# Altium PCB adau1979-fpga.PcbDoc (part 3 of 10)
Units mil, origin at the board's own origin, x right, y up, seen from the top; angles counter-clockwise.
Board outline 7874.02 x 9055.12 mil, 4 copper layers (Top Layer, GND, POWER, Bottom Layer), stack 23.756 mil thick; 636 components, 457 nets, 2015 pads, 4184 vias.
Unrouted connection lines stored in the file: 10.
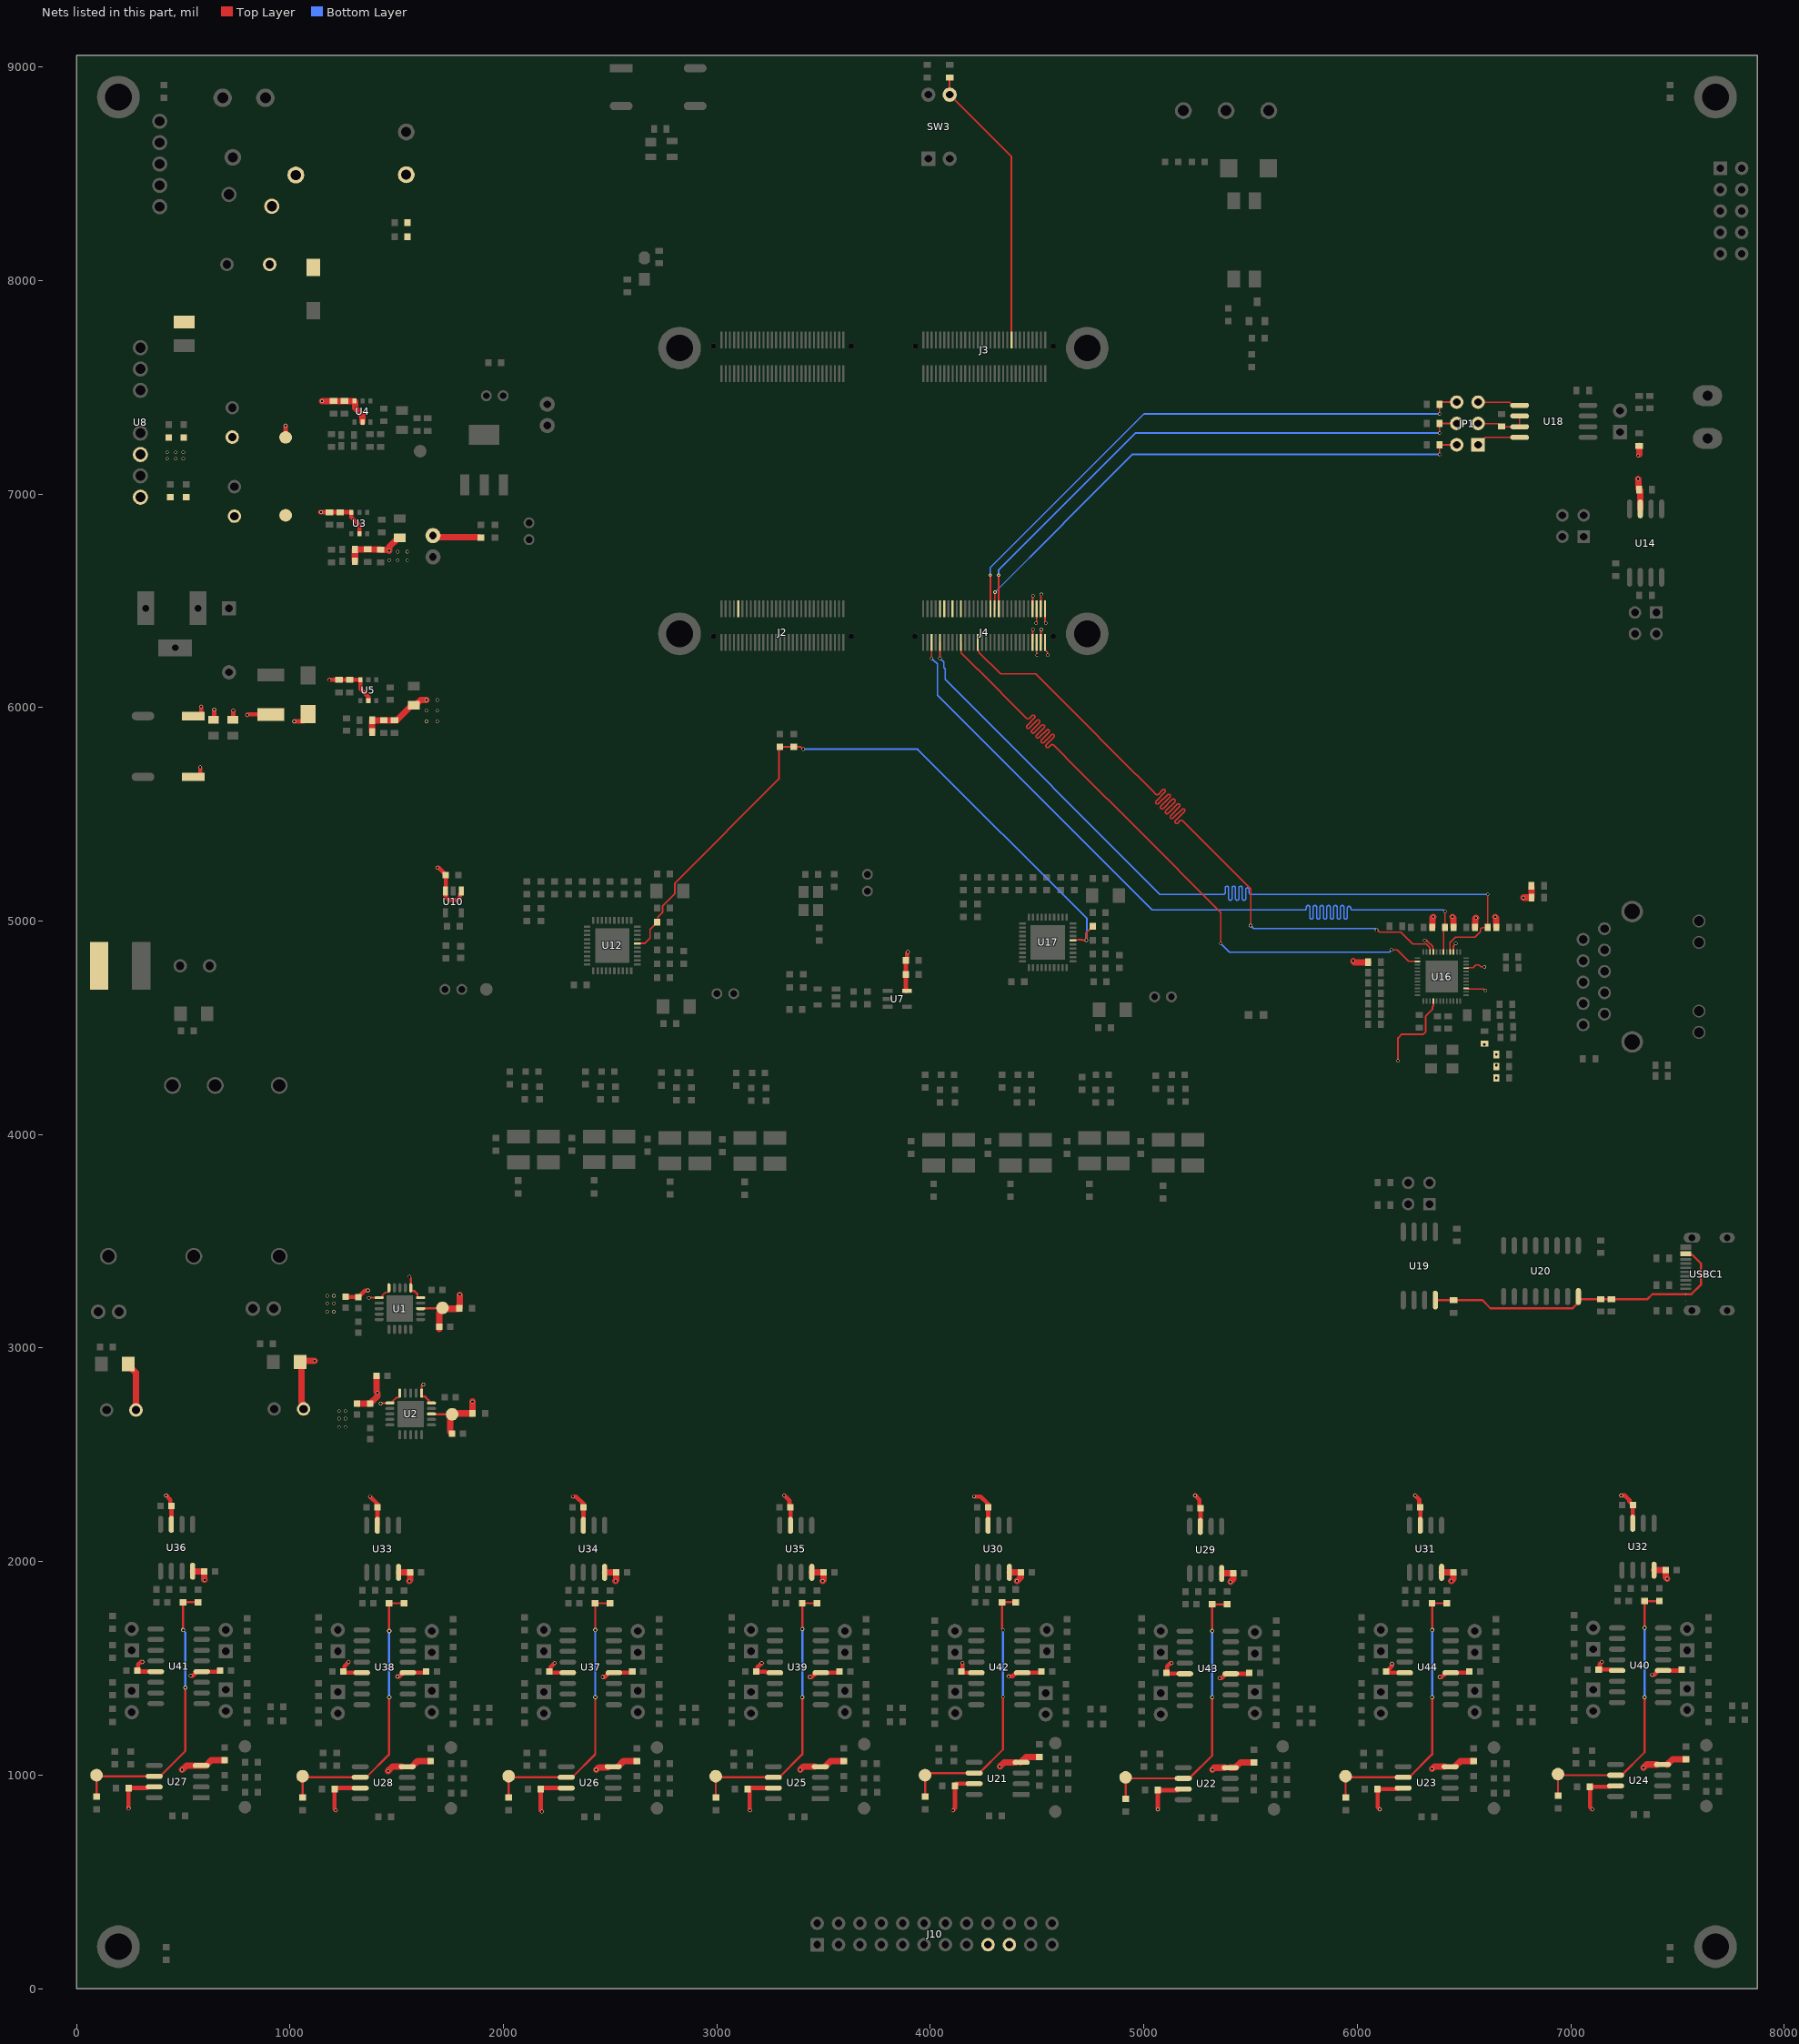
[diagram p4: the nets of this part, all layers, seen from the top]

## Part data (continued)
CON1 J6 J7 JP2 JP3 JP4 JP5 JP6 JP7 JP8 JP9 JP10 JP11 JP12 JP13 JP14 JP15 JP16 JP17 JP18 JP19 JP20 JP21 JP22 JP23 JP24 JP (continued)
  JP16: AddInBom=yes, DesignItemID="Header 2", Device="Header 2", FootprintName=HDR2.54-LI-2P, LibraryName="5.4 - 接插件-脚距2.54 (100mil)", Origin Footprint=XH2.54-WI-2P, OriginFootprint 2=XH2.54-LI-2P, OriginFootprint 3=HDR2.54-M-LI-2P, OriginFootprint 4=HDR2.54-WI-2P, OriginFootprint 5=HDR2.54-WS-2P, OriginFootprint 6=HDR2.54-Y-LI-2P, OriginFootprint 7=HDR2.54-M-WS-2P, OriginFootprint 8=KF2510-LI-2P, OriginFootprint 9=XH2.54-WS-2P, OriginFootprint 10=XH2.54-LS-2P, OriginFootprint 11=KF2EDGK-2.54-LI-2P, OriginFootprint 12=KF2EDGK-2.54-WI-2P, OriginModelName=HDR2.54-1P, SymbolName="Header 2", UniqueId=57b57ccbe062354d, 版权归属="封装库来自淘宝 ID：黄晶宝石", 联系售后=https://shop463601444.taobao.com
  JP17: AddInBom=yes, DesignItemID="Header 2", Device="Header 2", FootprintName=HDR2.54-LI-2P, LibraryName="5.4 - 接插件-脚距2.54 (100mil)", Origin Footprint=XH2.54-WI-2P, OriginFootprint 2=XH2.54-LI-2P, OriginFootprint 3=HDR2.54-M-LI-2P, OriginFootprint 4=HDR2.54-WI-2P, OriginFootprint 5=HDR2.54-WS-2P, OriginFootprint 6=HDR2.54-Y-LI-2P, OriginFootprint 7=HDR2.54-M-WS-2P, OriginFootprint 8=KF2510-LI-2P, OriginFootprint 9=XH2.54-WS-2P, OriginFootprint 10=XH2.54-LS-2P, OriginFootprint 11=KF2EDGK-2.54-LI-2P, OriginFootprint 12=KF2EDGK-2.54-WI-2P, OriginModelName=HDR2.54-1P, SymbolName="Header 2", UniqueId=c40e93d5b111b9de, 版权归属="封装库来自淘宝 ID：黄晶宝石", 联系售后=https://shop463601444.taobao.com
  JP18: AddInBom=yes, DesignItemID="Header 2", Device="Header 2", FootprintName=HDR2.54-LI-2P, LibraryName="5.4 - 接插件-脚距2.54 (100mil)", Origin Footprint=XH2.54-WI-2P, OriginFootprint 2=XH2.54-LI-2P, OriginFootprint 3=HDR2.54-M-LI-2P, OriginFootprint 4=HDR2.54-WI-2P, OriginFootprint 5=HDR2.54-WS-2P, OriginFootprint 6=HDR2.54-Y-LI-2P, OriginFootprint 7=HDR2.54-M-WS-2P, OriginFootprint 8=KF2510-LI-2P, OriginFootprint 9=XH2.54-WS-2P, OriginFootprint 10=XH2.54-LS-2P, OriginFootprint 11=KF2EDGK-2.54-LI-2P, OriginFootprint 12=KF2EDGK-2.54-WI-2P, OriginModelName=HDR2.54-1P, SymbolName="Header 2", UniqueId=d84cd54a2cd93ea0, 版权归属="封装库来自淘宝 ID：黄晶宝石", 联系售后=https://shop463601444.taobao.com
  JP19: AddInBom=yes, DesignItemID="Header 2", Device="Header 2", FootprintName=HDR2.54-LI-2P, LibraryName="5.4 - 接插件-脚距2.54 (100mil)", Origin Footprint=XH2.54-WI-2P, OriginFootprint 2=XH2.54-LI-2P, OriginFootprint 3=HDR2.54-M-LI-2P, OriginFootprint 4=HDR2.54-WI-2P, OriginFootprint 5=HDR2.54-WS-2P, OriginFootprint 6=HDR2.54-Y-LI-2P, OriginFootprint 7=HDR2.54-M-WS-2P, OriginFootprint 8=KF2510-LI-2P, OriginFootprint 9=XH2.54-WS-2P, OriginFootprint 10=XH2.54-LS-2P, OriginFootprint 11=KF2EDGK-2.54-LI-2P, OriginFootprint 12=KF2EDGK-2.54-WI-2P, OriginModelName=HDR2.54-1P, SymbolName="Header 2", UniqueId=dacbd2010d520776, 版权归属="封装库来自淘宝 ID：黄晶宝石", 联系售后=https://shop463601444.taobao.com
  JP20: AddInBom=yes, DesignItemID="Header 2", Device="Header 2", FootprintName=HDR2.54-LI-2P, LibraryName="5.4 - 接插件-脚距2.54 (100mil)", Origin Footprint=XH2.54-WI-2P, OriginFootprint 2=XH2.54-LI-2P, OriginFootprint 3=HDR2.54-M-LI-2P, OriginFootprint 4=HDR2.54-WI-2P, OriginFootprint 5=HDR2.54-WS-2P, OriginFootprint 6=HDR2.54-Y-LI-2P, OriginFootprint 7=HDR2.54-M-WS-2P, OriginFootprint 8=KF2510-LI-2P, OriginFootprint 9=XH2.54-WS-2P, OriginFootprint 10=XH2.54-LS-2P, OriginFootprint 11=KF2EDGK-2.54-LI-2P, OriginFootprint 12=KF2EDGK-2.54-WI-2P, OriginModelName=HDR2.54-1P, SymbolName="Header 2", UniqueId=61cd62acef56a4b1, 版权归属="封装库来自淘宝 ID：黄晶宝石", 联系售后=https://shop463601444.taobao.com
  JP21: AddInBom=yes, DesignItemID="Header 2", Device="Header 2", FootprintName=HDR2.54-LI-2P, LibraryName="5.4 - 接插件-脚距2.54 (100mil)", Origin Footprint=XH2.54-WI-2P, OriginFootprint 2=XH2.54-LI-2P, OriginFootprint 3=HDR2.54-M-LI-2P, OriginFootprint 4=HDR2.54-WI-2P, OriginFootprint 5=HDR2.54-WS-2P, OriginFootprint 6=HDR2.54-Y-LI-2P, OriginFootprint 7=HDR2.54-M-WS-2P, OriginFootprint 8=KF2510-LI-2P, OriginFootprint 9=XH2.54-WS-2P, OriginFootprint 10=XH2.54-LS-2P, OriginFootprint 11=KF2EDGK-2.54-LI-2P, OriginFootprint 12=KF2EDGK-2.54-WI-2P, OriginModelName=HDR2.54-1P, SymbolName="Header 2", UniqueId=228f0eb2e9fc8410, 版权归属="封装库来自淘宝 ID：黄晶宝石", 联系售后=https://shop463601444.taobao.com
  JP22: AddInBom=yes, DesignItemID="Header 2", Device="Header 2", FootprintName=HDR2.54-LI-2P, LibraryName="5.4 - 接插件-脚距2.54 (100mil)", Origin Footprint=XH2.54-WI-2P, OriginFootprint 2=XH2.54-LI-2P, OriginFootprint 3=HDR2.54-M-LI-2P, OriginFootprint 4=HDR2.54-WI-2P, OriginFootprint 5=HDR2.54-WS-2P, OriginFootprint 6=HDR2.54-Y-LI-2P, OriginFootprint 7=HDR2.54-M-WS-2P, OriginFootprint 8=KF2510-LI-2P, OriginFootprint 9=XH2.54-WS-2P, OriginFootprint 10=XH2.54-LS-2P, OriginFootprint 11=KF2EDGK-2.54-LI-2P, OriginFootprint 12=KF2EDGK-2.54-WI-2P, OriginModelName=HDR2.54-1P, SymbolName="Header 2", UniqueId=8401f236ce86758e, 版权归属="封装库来自淘宝 ID：黄晶宝石", 联系售后=https://shop463601444.taobao.com
  JP23: AddInBom=yes, DesignItemID="Header 2", Device="Header 2", FootprintName=HDR2.54-LI-2P, LibraryName="5.4 - 接插件-脚距2.54 (100mil)", Origin Footprint=XH2.54-WI-2P, OriginFootprint 2=XH2.54-LI-2P, OriginFootprint 3=HDR2.54-M-LI-2P, OriginFootprint 4=HDR2.54-WI-2P, OriginFootprint 5=HDR2.54-WS-2P, OriginFootprint 6=HDR2.54-Y-LI-2P, OriginFootprint 7=HDR2.54-M-WS-2P, OriginFootprint 8=KF2510-LI-2P, OriginFootprint 9=XH2.54-WS-2P, OriginFootprint 10=XH2.54-LS-2P, OriginFootprint 11=KF2EDGK-2.54-LI-2P, OriginFootprint 12=KF2EDGK-2.54-WI-2P, OriginModelName=HDR2.54-1P, SymbolName="Header 2", UniqueId=81515d3ba89c45d7, 版权归属="封装库来自淘宝 ID：黄晶宝石", 联系售后=https://shop463601444.taobao.com
  JP24: AddInBom=yes, DesignItemID="Header 2", Device="Header 2", FootprintName=HDR2.54-LI-2P, LibraryName="5.4 - 接插件-脚距2.54 (100mil)", Origin Footprint=XH2.54-WI-2P, OriginFootprint 2=XH2.54-LI-2P, OriginFootprint 3=HDR2.54-M-LI-2P, OriginFootprint 4=HDR2.54-WI-2P, OriginFootprint 5=HDR2.54-WS-2P, OriginFootprint 6=HDR2.54-Y-LI-2P, OriginFootprint 7=HDR2.54-M-WS-2P, OriginFootprint 8=KF2510-LI-2P, OriginFootprint 9=XH2.54-WS-2P, OriginFootprint 10=XH2.54-LS-2P, OriginFootprint 11=KF2EDGK-2.54-LI-2P, OriginFootprint 12=KF2EDGK-2.54-WI-2P, OriginModelName=HDR2.54-1P, SymbolName="Header 2", UniqueId=0a06460673946c5c, 版权归属="封装库来自淘宝 ID：黄晶宝石", 联系售后=https://shop463601444.taobao.com
  JP25: AddInBom=yes, DesignItemID="Header 2", Device="Header 2", FootprintName=HDR2.54-LI-2P, LibraryName="5.4 - 接插件-脚距2.54 (100mil)", Origin Footprint=XH2.54-WI-2P, OriginFootprint 2=XH2.54-LI-2P, OriginFootprint 3=HDR2.54-M-LI-2P, OriginFootprint 4=HDR2.54-WI-2P, OriginFootprint 5=HDR2.54-WS-2P, OriginFootprint 6=HDR2.54-Y-LI-2P, OriginFootprint 7=HDR2.54-M-WS-2P, OriginFootprint 8=KF2510-LI-2P, OriginFootprint 9=XH2.54-WS-2P, OriginFootprint 10=XH2.54-LS-2P, OriginFootprint 11=KF2EDGK-2.54-LI-2P, OriginFootprint 12=KF2EDGK-2.54-WI-2P, OriginModelName=HDR2.54-1P, SymbolName="Header 2", UniqueId=ac1a4a7fdd8dee85, 版权归属="封装库来自淘宝 ID：黄晶宝石", 联系售后=https://shop463601444.taobao.com
  JP26: AddInBom=yes, DesignItemID="Header 2", Device="Header 2", FootprintName=HDR2.54-LI-2P, LibraryName="5.4 - 接插件-脚距2.54 (100mil)", Origin Footprint=XH2.54-WI-2P, OriginFootprint 2=XH2.54-LI-2P, OriginFootprint 3=HDR2.54-M-LI-2P, OriginFootprint 4=HDR2.54-WI-2P, OriginFootprint 5=HDR2.54-WS-2P, OriginFootprint 6=HDR2.54-Y-LI-2P, OriginFootprint 7=HDR2.54-M-WS-2P, OriginFootprint 8=KF2510-LI-2P, OriginFootprint 9=XH2.54-WS-2P, OriginFootprint 10=XH2.54-LS-2P, OriginFootprint 11=KF2EDGK-2.54-LI-2P, OriginFootprint 12=KF2EDGK-2.54-WI-2P, OriginModelName=HDR2.54-1P, SymbolName="Header 2", UniqueId=7ff5f6d6ea161ff3, 版权归属="封装库来自淘宝 ID：黄晶宝石", 联系售后=https://shop463601444.taobao.com
  JP27: AddInBom=yes, DesignItemID="Header 2", Device="Header 2", FootprintName=HDR2.54-LI-2P, LibraryName="5.4 - 接插件-脚距2.54 (100mil)", Origin Footprint=XH2.54-WI-2P, OriginFootprint 2=XH2.54-LI-2P, OriginFootprint 3=HDR2.54-M-LI-2P, OriginFootprint 4=HDR2.54-WI-2P, OriginFootprint 5=HDR2.54-WS-2P, OriginFootprint 6=HDR2.54-Y-LI-2P, OriginFootprint 7=HDR2.54-M-WS-2P, OriginFootprint 8=KF2510-LI-2P, OriginFootprint 9=XH2.54-WS-2P, OriginFootprint 10=XH2.54-LS-2P, OriginFootprint 11=KF2EDGK-2.54-LI-2P, OriginFootprint 12=KF2EDGK-2.54-WI-2P, OriginModelName=HDR2.54-1P, SymbolName="Header 2", UniqueId=02277a1cd8d596a2, 版权归属="封装库来自淘宝 ID：黄晶宝石", 联系售后=https://shop463601444.taobao.com
  JP28: AddInBom=yes, DesignItemID="Header 2", Device="Header 2", FootprintName=HDR2.54-LI-2P, LibraryName="5.4 - 接插件-脚距2.54 (100mil)", Origin Footprint=XH2.54-WI-2P, OriginFootprint 2=XH2.54-LI-2P, OriginFootprint 3=HDR2.54-M-LI-2P, OriginFootprint 4=HDR2.54-WI-2P, OriginFootprint 5=HDR2.54-WS-2P, OriginFootprint 6=HDR2.54-Y-LI-2P, OriginFootprint 7=HDR2.54-M-WS-2P, OriginFootprint 8=KF2510-LI-2P, OriginFootprint 9=XH2.54-WS-2P, OriginFootprint 10=XH2.54-LS-2P, OriginFootprint 11=KF2EDGK-2.54-LI-2P, OriginFootprint 12=KF2EDGK-2.54-WI-2P, OriginModelName=HDR2.54-1P, SymbolName="Header 2", UniqueId=0f3af21d7fc89682, 版权归属="封装库来自淘宝 ID：黄晶宝石", 联系售后=https://shop463601444.taobao.com
  JP29: AddInBom=yes, DesignItemID="Header 2", Device="Header 2", FootprintName=HDR2.54-LI-2P, LibraryName="5.4 - 接插件-脚距2.54 (100mil)", Origin Footprint=XH2.54-WI-2P, OriginFootprint 2=XH2.54-LI-2P, OriginFootprint 3=HDR2.54-M-LI-2P, OriginFootprint 4=HDR2.54-WI-2P, OriginFootprint 5=HDR2.54-WS-2P, OriginFootprint 6=HDR2.54-Y-LI-2P, OriginFootprint 7=HDR2.54-M-WS-2P, OriginFootprint 8=KF2510-LI-2P, OriginFootprint 9=XH2.54-WS-2P, OriginFootprint 10=XH2.54-LS-2P, OriginFootprint 11=KF2EDGK-2.54-LI-2P, OriginFootprint 12=KF2EDGK-2.54-WI-2P, OriginModelName=HDR2.54-1P, SymbolName="Header 2", UniqueId=935b54861c2e40de, 版权归属="封装库来自淘宝 ID：黄晶宝石", 联系售后=https://shop463601444.taobao.com
  JP30: AddInBom=yes, DesignItemID="Header 2", Device="Header 2", FootprintName=HDR2.54-LI-2P, LibraryName="5.4 - 接插件-脚距2.54 (100mil)", Origin Footprint=XH2.54-WI-2P, OriginFootprint 2=XH2.54-LI-2P, OriginFootprint 3=HDR2.54-M-LI-2P, OriginFootprint 4=HDR2.54-WI-2P, OriginFootprint 5=HDR2.54-WS-2P, OriginFootprint 6=HDR2.54-Y-LI-2P, OriginFootprint 7=HDR2.54-M-WS-2P, OriginFootprint 8=KF2510-LI-2P, OriginFootprint 9=XH2.54-WS-2P, OriginFootprint 10=XH2.54-LS-2P, OriginFootprint 11=KF2EDGK-2.54-LI-2P, OriginFootprint 12=KF2EDGK-2.54-WI-2P, OriginModelName=HDR2.54-1P, SymbolName="Header 2", UniqueId=12cb931c49908c91, 版权归属="封装库来自淘宝 ID：黄晶宝石", 联系售后=https://shop463601444.taobao.com
  JP31: AddInBom=yes, DesignItemID="Header 2", Device="Header 2", FootprintName=HDR2.54-LI-2P, LibraryName="5.4 - 接插件-脚距2.54 (100mil)", Origin Footprint=XH2.54-WI-2P, OriginFootprint 2=XH2.54-LI-2P, OriginFootprint 3=HDR2.54-M-LI-2P, OriginFootprint 4=HDR2.54-WI-2P, OriginFootprint 5=HDR2.54-WS-2P, OriginFootprint 6=HDR2.54-Y-LI-2P, OriginFootprint 7=HDR2.54-M-WS-2P, OriginFootprint 8=KF2510-LI-2P, OriginFootprint 9=XH2.54-WS-2P, OriginFootprint 10=XH2.54-LS-2P, OriginFootprint 11=KF2EDGK-2.54-LI-2P, OriginFootprint 12=KF2EDGK-2.54-WI-2P, OriginModelName=HDR2.54-1P, SymbolName="Header 2", UniqueId=c76a900f0ccf0344, 版权归属="封装库来自淘宝 ID：黄晶宝石", 联系售后=https://shop463601444.taobao.com
  JP32: AddInBom=yes, DesignItemID="Header 2", Device="Header 2", FootprintName=HDR2.54-LI-2P, LibraryName="5.4 - 接插件-脚距2.54 (100mil)", Origin Footprint=XH2.54-WI-2P, OriginFootprint 2=XH2.54-LI-2P, OriginFootprint 3=HDR2.54-M-LI-2P, OriginFootprint 4=HDR2.54-WI-2P, OriginFootprint 5=HDR2.54-WS-2P, OriginFootprint 6=HDR2.54-Y-LI-2P, OriginFootprint 7=HDR2.54-M-WS-2P, OriginFootprint 8=KF2510-LI-2P, OriginFootprint 9=XH2.54-WS-2P, OriginFootprint 10=XH2.54-LS-2P, OriginFootprint 11=KF2EDGK-2.54-LI-2P, OriginFootprint 12=KF2EDGK-2.54-WI-2P, OriginModelName=HDR2.54-1P, SymbolName="Header 2", UniqueId=3883b53b87c5b88a, 版权归属="封装库来自淘宝 ID：黄晶宝石", 联系售后=https://shop463601444.taobao.com
  JP33: AddInBom=yes, DesignItemID="Header 2", Device="Header 2", FootprintName=HDR2.54-LI-2P, LibraryName="5.4 - 接插件-脚距2.54 (100mil)", Origin Footprint=XH2.54-WI-2P, OriginFootprint 2=XH2.54-LI-2P, OriginFootprint 3=HDR2.54-M-LI-2P, OriginFootprint 4=HDR2.54-WI-2P, OriginFootprint 5=HDR2.54-WS-2P, OriginFootprint 6=HDR2.54-Y-LI-2P, OriginFootprint 7=HDR2.54-M-WS-2P, OriginFootprint 8=KF2510-LI-2P, OriginFootprint 9=XH2.54-WS-2P, OriginFootprint 10=XH2.54-LS-2P, OriginFootprint 11=KF2EDGK-2.54-LI-2P, OriginFootprint 12=KF2EDGK-2.54-WI-2P, OriginModelName=HDR2.54-1P, SymbolName="Header 2", UniqueId=4fe8deccf3ecd12b, 版权归属="封装库来自淘宝 ID：黄晶宝石", 联系售后=https://shop463601444.taobao.com
D1: library part "DIODE BI-DIR TRIG"
D2: "极性:单向;反向截止电压(Vrwm):33V;钳位电压:53.3V;峰值脉冲电流(Ipp):11.3A@10/1000us;峰值脉冲功率(Ppp):600W@10/1000us;击穿电压:40.6V;", Clamping Voltage=53.3V, JLCPCB Part Class="Extended Part", LCSC Part Name=SMBJ33A, Manufacturer=Littelfuse(美国力特), Operating Temperature=-65℃~+150℃, Peak Pulse Current (Ipp)=11.3A@10/1000us, Peak Pulse Power Dissipation (Ppp)=600W@10/1000us, Reverse Leakage Current (Ir)=1uA, Reverse Stand-Off Voltage (Vrwm)=33V, Voltage - Breakdown=40.6V, AddInBom=yes, ConvertToPcb=yes, Datasheet=https://item.szlcsc.com/datasheet/SMBJ33A/224167.html, FootprintName=SMB_L4.6-W3.6-LS5.3-RD, level of protection="IEC 61000-4-4；IEC 61000-4-2", ManufacturerPart=SMBJ33A, ModelId=5e8926c661484ff2a35b83e5ae62aeb9, ModelName=SMB_L4.6-W3.6-LS5.3-RD, ModelTransform=212.598,141.732,0,0,0,0,0,0,0, Polarity=单向, Supplier=LCSC, Supplier Footprint=SMB(DO-214AA), SupplierPart=C224019, Symbol=SMBJ33A_C224019, Type=TVS
D3: library part BZT52C24_C571382, BOM_JLCPCB Part Class="Extended Part", BOM_Manufacturer="High Diode", BOM_Manufacturer Part=BZT52C24, BOM_Supplier=LCSC, BOM_Supplier Part=C571382, Contributor=LCSC, spicePre=D, spiceSymbolName=BZT52C24_C571382
F1: library part FUSE
F2: BOM_JLCPCB Part Class="Extended Part", BOM_Manufacturer="TLC Electronic", BOM_Manufacturer Part=TRB300, BOM_Supplier=LCSC, BOM_Supplier Part=C262070, Contributor=LCSC, spicePre=F, spiceSymbolName=TRB300
J1 J2 J3 J4: library part 2X30PIN
J5: library part 2X5PIN
J10: library part "Header 12X2", "12*2P接插件", BOM名称=12*2P接插件, 学习资源=https://shop463601444.taobao.com, 版权归属="封装库来自淘宝卖家 ID：黄晶宝石"
JP1: library part "Header 3X2", "3*2P接插件", BOM名称=3*2P接插件, 学习资源=https://shop463601444.taobao.com, 版权归属="封装库来自淘宝 ID：黄晶宝石"
L1 L2 L3 L6 L10: library part L, "小功率贴片电感", BOM名称=小功率贴片电感, 封装库来自淘宝卖家 ID：黄晶宝石=其他店铺购入均为盗版，不享受售后技术支持服务，请立即申请退款, 淘宝ID="封装库来自淘宝 ID：黄晶宝石", 联系售后=https://shop463601444.taobao.com
L4: library part Inductor, "Inductor", Code_IEC=1005, Code_JEITA=0402, LatestRevisionDate=29-May-2009, LatestRevisionNote="IPC-7351 Footprint Added.", PackageDescription="Chip Inductor", PackageReference=0402-A, Published=8-Jun-2000, Publisher="Altium Limited"
L5: "标称阻抗@测试频率:220Ω@100MHz;误差:±25%;直流电阻(RDC):50mΩ;", Current Rating=2.2A, DC Resistance=50mΩ, Impedance @ Frequency=220Ω@100MHz, JLCPCB Part Class="Extended Part", LCSC Part Name="单路 0603磁珠 阻抗220Ω@100MHz", Manufacturer=TDK, ManufacturerPart=MPZ1608S221ATA00, Tolerance=±25%, AddInBom=yes, Circuits=1, ConvertToPcb=yes, Datasheet=https://atta.szlcsc.com/upload/public/pdf/source/20160918/1474166931723.pdf, FootprintName=L0603, ModelId=2bc5ec593d464d6ba9807aec0b5673c2, ModelName=L0603_L1.6-W0.8-H0.5_BEAD, ModelTransform=62.992,31.496,0,180,0,0,0.094,0.629,0, Supplier=LCSC, Supplier Footprint=0603, SupplierPart=C76815, Symbol=MPZ1608S221ATA00
L7 L9: "阻抗@频率:120Ω@100MHz;误差:±25%;直流电阻(DCR):20mΩ;", Current Rating=3.5A, DC Resistance(DCR)=20mΩ, Impedance @ Frequency=120Ω@100MHz, JLCPCB Part Class="Extended Part", LCSC Part Name="单路 1206磁珠 阻抗120Ω@100MHz", Manufacturer=muRata(村田), ManufacturerPart=BLM31PG121SN1L, Operating Temperature=-55℃~+125℃, Tolerance=±25%, AddInBom=yes, ConvertToPcb=yes, Datasheet=https://item.szlcsc.com/datasheet/BLM31PG121SN1L/87017.html, FootprintName=L1206, ModelId=85bdab7b3d4c4074b81d208eb5e865b3, ModelName=L1206_L3.2-W1.6-H1.1, ModelTransform=125.984,62.835,0,0,0,0,0,0,0, Number of Circuits=1, Supplier=LCSC, Supplier Footprint=1206, SupplierPart=C85841, Symbol=BLM31PG121SN1L
L8: "电感值:4.7uH;精度:±20%;额定电流:4.5A;饱和电流(Isat):6.8A;类型:-;", Current - Saturation(Isat)=6.8A, Current Rating=4.5A, DC Resistance(DCR)=26mΩ, JLCPCB Part Class="Extended Part", LCSC Part Name="4.7uH ±20% 6.8A", Manufacturer=BOURNS, ManufacturerPart=SRN6045TA-4R7M, Tolerance=±20%, AddInBom=yes, ConvertToPcb=yes, Datasheet=https://item.szlcsc.com/datasheet/SRN6045TA-4R7M/2136160.html, FootprintName=IND-SMD_L6.0-W6.0, ModelId=30081a2752cd45e4871fd4480d5f295c, ModelName=IND-SMD_L6.0-W6.0-H4.5, ModelTransform=236.22,237.007,0,90,0,0,-0.005,0,0, Supplier=LCSC, Supplier Footprint=SMD,6x6mm, SupplierPart=C2044594, Symbol=SRN6045TA-4R7M, Type=-
LED1: "发光二极管", 技术支持，联系售后=https://shop463601444.taobao.com
OSC1: "频率:24.576MHz;常温频差:±10ppm;输出模式:CMOS;工作电压:1.8V~3.3V;频率稳定度:±20ppm;", Frequency Stability=±20ppm, JLCPCB Part Class="Extended Part", LCSC Part Name="YSO110TR 24.576MHZ 1.8V-3.3V ±10PPM -40~85℃（±20PPM) CMOS", Manufacturer=YXC(扬兴晶振), ManufacturerPart=OT2EL4C4JI-111OLP-24.576M, Normal temperature Frequency Tolerance=±10ppm, Operating Temperature=-40℃~+85℃, Voltage - Supply=1.8V~3.3V, AddInBom=yes, ConvertToPcb=yes, Datasheet=https://item.szlcsc.com/datasheet/OT2EL4C4JI-111OLP-24.576M/5892909.html, FootprintName=OSC-SMD_4P-L3.2-W2.5-BL, ModelId=ae22b8d143894765bc8100c37cb6356f, ModelName=OSC-SMD_4P-L3.2-W2.5-H1.0, ModelTransform=125.984,98.425,0,0,0,0,0,0,0, Output Type=CMOS, Supplier=LCSC, Supplier Footprint=SMD3225-4P, SupplierPart=C5203547, Symbol=OT2EL4C4JI-111OLP-24.576M
P1: "结构:1x3P;间距:5.08mm;颜色:绿色;安装类型:直插;排数:1;每排PIN数:3;额定电流:18A;额定电压:250V;线规 - AWG:14~30;线规 - 平方毫米:2.5;工作温度:-40℃~+105℃;", Color=绿色, Current Rating=18A, JLCPCB Part Class="Extended Part", LCSC Part Name="1x3P 5.08mm 直插 排数:1 每排P数:3", Manufacturer=KANGNEX(康奈克斯电气), ManufacturerPart=WJ500V-5.08-03P-14-00A, Operating Temperature=-40℃~+105℃, Voltage Rating (Max)=250V, AddInBom=yes, ConvertToPcb=yes, Datasheet=https://item.szlcsc.com/datasheet/WJ500V-5.08-03P-14-00A/73443.html, FootprintName=CONN-TH_3P-P5.00_WJ500V-5.08-3P, Height Above Board=14.07mm, ModelId=f80d5090781743d49abcb05979f5618f, ModelName=CONN-TH_3P-P5.00_WJ500V-5.08-3P, ModelTransform=623.621,393.7,0,0,0,0,11.811,-20.315,-177.165, Mounting Type=直插, Number of Pins=3P, Number of PINs Per Row=3, Number of Positions or Pins=1x3P, Number of Rows=1, Pitch=5.08mm, Screw Specification=M2.5, Supplier=LCSC, Supplier Footprint=插件,P=5.08mm, SupplierPart=C72334, Symbol=WJ500V-5.08-3P-14-00A, Wire Gauge - AWG=14~30, Wire Gauge - mm2=2.5
P2: library part "Header 2", "Header, 2-Pin", LatestRevisionDate=17-Jul-2002, LatestRevisionNote="Re-released for DXP Platform.", Publisher="Altium Limited"
Q1: "数量:1个N沟道;漏源电压(Vdss):60V;连续漏极电流(Id):300mA;导通电阻(RDS(on)):5Ω@10V;耗散功率(Pd):830mW;阈值电压(Vgs(th)):2.5V;", Current - Continuous Drain(Id)=300mA, Drain to Source Voltage=60V, Gate Threshold Voltage (Vgs(th))=2.5V, Input Capacitance(Ciss)=50pF, JLCPCB Part Class="Extended Part", LCSC Part Name="1个N沟道 耐压:60V 电流:300mA", Manufacturer=Nexperia(安世), ManufacturerPart=2N7002,215, Operating Temperature=-65℃~+150℃, Output Capacitance(Coss)=6.8pF, Pd - Power Dissipation=830mW, Reverse Transfer Capacitance (Crss@Vds)=3.5pF, AddInBom=yes, Configuration=-, ConvertToPcb=yes, Datasheet=https://item.szlcsc.com/datasheet/2N7002%252C215/66260.html, FootprintName=SOT-23_L2.9-W1.3-P1.90-LS2.4-BR, Gate Charge(Qg)=-, ModelId=c62791f0466c4ae2a892c056b845b0ca, ModelName=SOT-23-3P_L2.9-W1.3-H1.0-LS2.4-P0.95, ModelTransform=98.64468,114.173,0,180,0,0,0.001,-0.002,0, Number=1个N沟道, RDS(on)=5Ω@10V, Supplier=LCSC, Supplier Footprint=SOT-23, SupplierPart=C65189, Symbol=2N7002,215, Type=N沟道, Vgs=±30V
R1 R2 R3 R4 R5 R6 R7 R8 R9 R10 R11 R12 R13 R14 R15 R16 R17 R18 R19 R20 R21 R22 R23 R24 R27 R28 R29 R31 R32 R33 R34 R35 R36 R37 R38 R39 R40 R41 R43 R45 R46 R48 R50 R51 R52 R53 R54 R55 R56 R57 R58 R59 R60 R61 R62 R63 R64 R65 R66 R67 R68 R69 R70 R71 R72 R73 R74 R75 R76 R77 R78 R79 R80 R81 R82 R83 R84 R85 R86 R87 R88 R90 R92 R93 R95 R96 R98 R99 R100 R101 R102 R103 R104 R105 R106 R107 R108 R109 R110 R111 R112 R113 R114 R115 R116 R117 R118 R119 R120 R121 R122 R123 R124 R125 R126 R127 R128 R129 R130 R131 R132 R133 R134 R135 R136 R137 R138 R139 R140 R141 R142 R143 R144 R145 R146 R147 R148 R149 R150 R151 R152 R153 R154 R155 R156 R157 R158 R159 R160 R161 R162 R163 R164 R165 R166 R167 R168 R169 R170 R171 R172 R173 R174 R175 R176 R177 R178 R179 R180 R181 R182 R183 R184 R185 R186 R187 R188 R189 R190 R191 R192 R193 R194 R195 R196 R197 R198 R199 R200 R201 R202 R203 R204 R205 R206 R207 R208 R209 R210 R211 R212 R213 R214 R215 R216 R217 R218 R219 R220 R221 R222 R223 R224 R225 R226 R227 R228 R229 R230 R231 R232 R233 R234 R235 R236 R237 R238 R239 R240 R241 R242 R243 R244 R245 R246 R247 R248 R249 R250 R251 R252 R253 R254 R255 R256 R257 R258 R259 R260 R261 R262 R263 R264 R265 R266 R267 R268 Rg1 Rg2 Rg3 Rg4 Rg5 Rg6 Rg7 Rg8: library part R, "贴片电阻", BOM名称=贴片电阻
  R1 R3 R7 R8 R9 R10 R11 R12 R13 R14 R15 R17 R18 R23 R24 R31 R38 R45 R46 R51 R56 R57 R60 R61 R62 R63 R64 R72 R74 R75 R77 R83 R84 R86 R87 R90 R93 R95 R96 R99 R101 R104 R106 R110 R111 R112 R114 R115 R116 R118 R120 R121 R124 R125 R126 R127 R128 R129 R130 R131 R132 R133 R134 R135 R136 R137 R138 R139 R140 R141 R142 R143 R144 R145 R146 R147 R148 R149 R150 R151 R152 R153 R154 R155 R156 R193 R204 R205 R208 R211 R212 R213 R218 R221 R228 R230 R232 R235 R236 R237 R243 R248 R254 R256 R258 R261 R263 R265 R267 Rg1 Rg2 Rg3 Rg4 Rg5 Rg6 Rg7 Rg8: 封装库来自淘宝卖家 ID：黄晶宝石=其他店铺购入均为盗版，不享受售后技术支持服务，请立即申请退款, 版权归属="来自淘宝 ID：黄晶宝石", 联系售后=https://shop463601444.taobao.com
  R2 R4 R5 R6: AddInBom=yes, DesignItemID=R, Device=R, FootprintName="R 0603_L", LibraryName="0.1 - 电阻-电容-电感", Origin Footprint="R 0201_L", OriginFootprint 2="R 0402_L", OriginFootprint 3="R 0805_L", OriginFootprint 4="R 1206_L", OriginFootprint 5="R 1210_L", OriginFootprint 6="R 1812_L", OriginFootprint 7="R 2010_L", OriginFootprint 8="R 2512_L", OriginFootprint 9="R 0201_M", OriginFootprint 10="R 0402_M", OriginFootprint 11="R 0603_M", OriginFootprint 12="R 0805_M", OriginFootprint 13="R 1206_M", OriginFootprint 14="R 1210_M", OriginFootprint 15="R 1812_M", OriginFootprint 16="R 2010_M", OriginFootprint 17="R 2512_M", OriginModelName="R 0603", Symbol=R, 封装库来自淘宝卖家 ID：黄晶宝石=其他店铺购入均为盗版，不享受售后技术支持服务，请立即申请退款, 版权归属="来自淘宝 ID：黄晶宝石", 联系售后=https://shop463601444.taobao.com
  R16 R19 R20 R21 R22 R27 R28 R29 R32 R33 R34 R35 R36 R37 R39 R40 R41 R43 R48 R50 R52 R53 R54 R55 R58 R59 R65 R66 R67 R68 R69 R70 R71 R73 R76 R78 R79 R80 R81 R82 R85 R88 R92 R98 R100 R102 R103 R105 R107 R108 R109 R113 R117 R119 R122 R123: 学习资源=www.ooocke.com, 版权归属=源创客
  R157: AddInBom=yes, DesignItemID=R, Device=R, FootprintName="R 0603_L", LibraryName="0.1 - 电阻-电容-电感", Origin Footprint="R 0201_L", OriginFootprint 2="R 0402_L", OriginFootprint 3="R 0805_L", OriginFootprint 4="R 1206_L", OriginFootprint 5="R 1210_L", OriginFootprint 6="R 1812_L", OriginFootprint 7="R 2010_L", OriginFootprint 8="R 2512_L", OriginFootprint 9="R 0201_M", OriginFootprint 10="R 0402_M", OriginFootprint 11="R 0603_M", OriginFootprint 12="R 0805_M", OriginFootprint 13="R 1206_M", OriginFootprint 14="R 1210_M", OriginFootprint 15="R 1812_M", OriginFootprint 16="R 2010_M", OriginFootprint 17="R 2512_M", OriginModelName="R 0603", SymbolName=R, UniqueId=60493bf970b6a222, 封装库来自淘宝卖家 ID：黄晶宝石=其他店铺购入均为盗版，不享受售后技术支持服务，请立即申请退款, 版权归属="来自淘宝 ID：黄晶宝石", 联系售后=https://shop463601444.taobao.com
  R158: AddInBom=yes, DesignItemID=R, Device=R, FootprintName="R 0603_L", LibraryName="0.1 - 电阻-电容-电感", Origin Footprint="R 0201_L", OriginFootprint 2="R 0402_L", OriginFootprint 3="R 0805_L", OriginFootprint 4="R 1206_L", OriginFootprint 5="R 1210_L", OriginFootprint 6="R 1812_L", OriginFootprint 7="R 2010_L", OriginFootprint 8="R 2512_L", OriginFootprint 9="R 0201_M", OriginFootprint 10="R 0402_M", OriginFootprint 11="R 0603_M", OriginFootprint 12="R 0805_M", OriginFootprint 13="R 1206_M", OriginFootprint 14="R 1210_M", OriginFootprint 15="R 1812_M", OriginFootprint 16="R 2010_M", OriginFootprint 17="R 2512_M", OriginModelName="R 0603", SymbolName=R, UniqueId=4cc02cdac8efc8e2, 封装库来自淘宝卖家 ID：黄晶宝石=其他店铺购入均为盗版，不享受售后技术支持服务，请立即申请退款, 版权归属="来自淘宝 ID：黄晶宝石", 联系售后=https://shop463601444.taobao.com
  R159: AddInBom=yes, DesignItemID=R, Device=R, FootprintName="R 0603_L", LibraryName="0.1 - 电阻-电容-电感", Origin Footprint="R 0201_L", OriginFootprint 2="R 0402_L", OriginFootprint 3="R 0805_L", OriginFootprint 4="R 1206_L", OriginFootprint 5="R 1210_L", OriginFootprint 6="R 1812_L", OriginFootprint 7="R 2010_L", OriginFootprint 8="R 2512_L", OriginFootprint 9="R 0201_M", OriginFootprint 10="R 0402_M", OriginFootprint 11="R 0603_M", OriginFootprint 12="R 0805_M", OriginFootprint 13="R 1206_M", OriginFootprint 14="R 1210_M", OriginFootprint 15="R 1812_M", OriginFootprint 16="R 2010_M", OriginFootprint 17="R 2512_M", OriginModelName="R 0603", SymbolName=R, UniqueId=ef32c3a96261eb70, 封装库来自淘宝卖家 ID：黄晶宝石=其他店铺购入均为盗版，不享受售后技术支持服务，请立即申请退款, 版权归属="来自淘宝 ID：黄晶宝石", 联系售后=https://shop463601444.taobao.com
  R160: AddInBom=yes, DesignItemID=R, Device=R, FootprintName="R 0603_L", LibraryName="0.1 - 电阻-电容-电感", Origin Footprint="R 0201_L", OriginFootprint 2="R 0402_L", OriginFootprint 3="R 0805_L", OriginFootprint 4="R 1206_L", OriginFootprint 5="R 1210_L", OriginFootprint 6="R 1812_L", OriginFootprint 7="R 2010_L", OriginFootprint 8="R 2512_L", OriginFootprint 9="R 0201_M", OriginFootprint 10="R 0402_M", OriginFootprint 11="R 0603_M", OriginFootprint 12="R 0805_M", OriginFootprint 13="R 1206_M", OriginFootprint 14="R 1210_M", OriginFootprint 15="R 1812_M", OriginFootprint 16="R 2010_M", OriginFootprint 17="R 2512_M", OriginModelName="R 0603", SymbolName=R, UniqueId=b2ee10c0a9f54310, 封装库来自淘宝卖家 ID：黄晶宝石=其他店铺购入均为盗版，不享受售后技术支持服务，请立即申请退款, 版权归属="来自淘宝 ID：黄晶宝石", 联系售后=https://shop463601444.taobao.com
  R161: AddInBom=yes, DesignItemID=R, Device=R, FootprintName="R 0603_L", LibraryName="0.1 - 电阻-电容-电感", Origin Footprint="R 0201_L", OriginFootprint 2="R 0402_L", OriginFootprint 3="R 0805_L", OriginFootprint 4="R 1206_L", OriginFootprint 5="R 1210_L", OriginFootprint 6="R 1812_L", OriginFootprint 7="R 2010_L", OriginFootprint 8="R 2512_L", OriginFootprint 9="R 0201_M", OriginFootprint 10="R 0402_M", OriginFootprint 11="R 0603_M", OriginFootprint 12="R 0805_M", OriginFootprint 13="R 1206_M", OriginFootprint 14="R 1210_M", OriginFootprint 15="R 1812_M", OriginFootprint 16="R 2010_M", OriginFootprint 17="R 2512_M", OriginModelName="R 0603", SymbolName=R, UniqueId=e6add4189764555f, 封装库来自淘宝卖家 ID：黄晶宝石=其他店铺购入均为盗版，不享受售后技术支持服务，请立即申请退款, 版权归属="来自淘宝 ID：黄晶宝石", 联系售后=https://shop463601444.taobao.com
  R162: AddInBom=yes, DesignItemID=R, Device=R, FootprintName="R 0603_L", LibraryName="0.1 - 电阻-电容-电感", Origin Footprint="R 0201_L", OriginFootprint 2="R 0402_L", OriginFootprint 3="R 0805_L", OriginFootprint 4="R 1206_L", OriginFootprint 5="R 1210_L", OriginFootprint 6="R 1812_L", OriginFootprint 7="R 2010_L", OriginFootprint 8="R 2512_L", OriginFootprint 9="R 0201_M", OriginFootprint 10="R 0402_M", OriginFootprint 11="R 0603_M", OriginFootprint 12="R 0805_M", OriginFootprint 13="R 1206_M", OriginFootprint 14="R 1210_M", OriginFootprint 15="R 1812_M", OriginFootprint 16="R 2010_M", OriginFootprint 17="R 2512_M", OriginModelName="R 0603", SymbolName=R, UniqueId=e7f646629e87fbc8, 封装库来自淘宝卖家 ID：黄晶宝石=其他店铺购入均为盗版，不享受售后技术支持服务，请立即申请退款, 版权归属="来自淘宝 ID：黄晶宝石", 联系售后=https://shop463601444.taobao.com
  R163: AddInBom=yes, DesignItemID=R, Device=R, FootprintName="R 0603_L", LibraryName="0.1 - 电阻-电容-电感", Origin Footprint="R 0201_L", OriginFootprint 2="R 0402_L", OriginFootprint 3="R 0805_L", OriginFootprint 4="R 1206_L", OriginFootprint 5="R 1210_L", OriginFootprint 6="R 1812_L", OriginFootprint 7="R 2010_L", OriginFootprint 8="R 2512_L", OriginFootprint 9="R 0201_M", OriginFootprint 10="R 0402_M", OriginFootprint 11="R 0603_M", OriginFootprint 12="R 0805_M", OriginFootprint 13="R 1206_M", OriginFootprint 14="R 1210_M", OriginFootprint 15="R 1812_M", OriginFootprint 16="R 2010_M", OriginFootprint 17="R 2512_M", OriginModelName="R 0603", SymbolName=R, UniqueId=21524ddd3d38a4e3, 封装库来自淘宝卖家 ID：黄晶宝石=其他店铺购入均为盗版，不享受售后技术支持服务，请立即申请退款, 版权归属="来自淘宝 ID：黄晶宝石", 联系售后=https://shop463601444.taobao.com
  R164: AddInBom=yes, DesignItemID=R, Device=R, FootprintName="R 0603_L", LibraryName="0.1 - 电阻-电容-电感", Origin Footprint="R 0201_L", OriginFootprint 2="R 0402_L", OriginFootprint 3="R 0805_L", OriginFootprint 4="R 1206_L", OriginFootprint 5="R 1210_L", OriginFootprint 6="R 1812_L", OriginFootprint 7="R 2010_L", OriginFootprint 8="R 2512_L", OriginFootprint 9="R 0201_M", OriginFootprint 10="R 0402_M", OriginFootprint 11="R 0603_M", OriginFootprint 12="R 0805_M", OriginFootprint 13="R 1206_M", OriginFootprint 14="R 1210_M", OriginFootprint 15="R 1812_M", OriginFootprint 16="R 2010_M", OriginFootprint 17="R 2512_M", OriginModelName="R 0603", SymbolName=R, UniqueId=214b1954295082c1, 封装库来自淘宝卖家 ID：黄晶宝石=其他店铺购入均为盗版，不享受售后技术支持服务，请立即申请退款, 版权归属="来自淘宝 ID：黄晶宝石", 联系售后=https://shop463601444.taobao.com
  R165: AddInBom=yes, DesignItemID=R, Device=R, FootprintName="R 0603_L", LibraryName="0.1 - 电阻-电容-电感", Origin Footprint="R 0201_L", OriginFootprint 2="R 0402_L", OriginFootprint 3="R 0805_L", OriginFootprint 4="R 1206_L", OriginFootprint 5="R 1210_L", OriginFootprint 6="R 1812_L", OriginFootprint 7="R 2010_L", OriginFootprint 8="R 2512_L", OriginFootprint 9="R 0201_M", OriginFootprint 10="R 0402_M", OriginFootprint 11="R 0603_M", OriginFootprint 12="R 0805_M", OriginFootprint 13="R 1206_M", OriginFootprint 14="R 1210_M", OriginFootprint 15="R 1812_M", OriginFootprint 16="R 2010_M", OriginFootprint 17="R 2512_M", OriginModelName="R 0603", SymbolName=R, UniqueId=8a972535593efa61, 封装库来自淘宝卖家 ID：黄晶宝石=其他店铺购入均为盗版，不享受售后技术支持服务，请立即申请退款, 版权归属="来自淘宝 ID：黄晶宝石", 联系售后=https://shop463601444.taobao.com
  R166: AddInBom=yes, DesignItemID=R, Device=R, FootprintName="R 0603_L", LibraryName="0.1 - 电阻-电容-电感", Origin Footprint="R 0201_L", OriginFootprint 2="R 0402_L", OriginFootprint 3="R 0805_L", OriginFootprint 4="R 1206_L", OriginFootprint 5="R 1210_L", OriginFootprint 6="R 1812_L", OriginFootprint 7="R 2010_L", OriginFootprint 8="R 2512_L", OriginFootprint 9="R 0201_M", OriginFootprint 10="R 0402_M", OriginFootprint 11="R 0603_M", OriginFootprint 12="R 0805_M", OriginFootprint 13="R 1206_M", OriginFootprint 14="R 1210_M", OriginFootprint 15="R 1812_M", OriginFootprint 16="R 2010_M", OriginFootprint 17="R 2512_M", OriginModelName="R 0603", SymbolName=R, UniqueId=0c441820cbabe695, 封装库来自淘宝卖家 ID：黄晶宝石=其他店铺购入均为盗版，不享受售后技术支持服务，请立即申请退款, 版权归属="来自淘宝 ID：黄晶宝石", 联系售后=https://shop463601444.taobao.com
  R167: AddInBom=yes, DesignItemID=R, Device=R, FootprintName="R 0603_L", LibraryName="0.1 - 电阻-电容-电感", Origin Footprint="R 0201_L", OriginFootprint 2="R 0402_L", OriginFootprint 3="R 0805_L", OriginFootprint 4="R 1206_L", OriginFootprint 5="R 1210_L", OriginFootprint 6="R 1812_L", OriginFootprint 7="R 2010_L", OriginFootprint 8="R 2512_L", OriginFootprint 9="R 0201_M", OriginFootprint 10="R 0402_M", OriginFootprint 11="R 0603_M", OriginFootprint 12="R 0805_M", OriginFootprint 13="R 1206_M", OriginFootprint 14="R 1210_M", OriginFootprint 15="R 1812_M", OriginFootprint 16="R 2010_M", OriginFootprint 17="R 2512_M", OriginModelName="R 0603", SymbolName=R, UniqueId=5d7d37af6db8001c, 封装库来自淘宝卖家 ID：黄晶宝石=其他店铺购入均为盗版，不享受售后技术支持服务，请立即申请退款, 版权归属="来自淘宝 ID：黄晶宝石", 联系售后=https://shop463601444.taobao.com
  R168: AddInBom=yes, DesignItemID=R, Device=R, FootprintName="R 0603_L", LibraryName="0.1 - 电阻-电容-电感", Origin Footprint="R 0201_L", OriginFootprint 2="R 0402_L", OriginFootprint 3="R 0805_L", OriginFootprint 4="R 1206_L", OriginFootprint 5="R 1210_L", OriginFootprint 6="R 1812_L", OriginFootprint 7="R 2010_L", OriginFootprint 8="R 2512_L", OriginFootprint 9="R 0201_M", OriginFootprint 10="R 0402_M", OriginFootprint 11="R 0603_M", OriginFootprint 12="R 0805_M", OriginFootprint 13="R 1206_M", OriginFootprint 14="R 1210_M", OriginFootprint 15="R 1812_M", OriginFootprint 16="R 2010_M", OriginFootprint 17="R 2512_M", OriginModelName="R 0603", SymbolName=R, UniqueId=37ee6d28f6c4dade, 封装库来自淘宝卖家 ID：黄晶宝石=其他店铺购入均为盗版，不享受售后技术支持服务，请立即申请退款, 版权归属="来自淘宝 ID：黄晶宝石", 联系售后=https://shop463601444.taobao.com
  R169: AddInBom=yes, DesignItemID=R, Device=R, FootprintName="R 0603_L", LibraryName="0.1 - 电阻-电容-电感", Origin Footprint="R 0201_L", OriginFootprint 2="R 0402_L", OriginFootprint 3="R 0805_L", OriginFootprint 4="R 1206_L", OriginFootprint 5="R 1210_L", OriginFootprint 6="R 1812_L", OriginFootprint 7="R 2010_L", OriginFootprint 8="R 2512_L", OriginFootprint 9="R 0201_M", OriginFootprint 10="R 0402_M", OriginFootprint 11="R 0603_M", OriginFootprint 12="R 0805_M", OriginFootprint 13="R 1206_M", OriginFootprint 14="R 1210_M", OriginFootprint 15="R 1812_M", OriginFootprint 16="R 2010_M", OriginFootprint 17="R 2512_M", OriginModelName="R 0603", SymbolName=R, UniqueId=fe3640da4f52432f, 封装库来自淘宝卖家 ID：黄晶宝石=其他店铺购入均为盗版，不享受售后技术支持服务，请立即申请退款, 版权归属="来自淘宝 ID：黄晶宝石", 联系售后=https://shop463601444.taobao.com
  R170: AddInBom=yes, DesignItemID=R, Device=R, FootprintName="R 0603_L", LibraryName="0.1 - 电阻-电容-电感", Origin Footprint="R 0201_L", OriginFootprint 2="R 0402_L", OriginFootprint 3="R 0805_L", OriginFootprint 4="R 1206_L", OriginFootprint 5="R 1210_L", OriginFootprint 6="R 1812_L", OriginFootprint 7="R 2010_L", OriginFootprint 8="R 2512_L", OriginFootprint 9="R 0201_M", OriginFootprint 10="R 0402_M", OriginFootprint 11="R 0603_M", OriginFootprint 12="R 0805_M", OriginFootprint 13="R 1206_M", OriginFootprint 14="R 1210_M", OriginFootprint 15="R 1812_M", OriginFootprint 16="R 2010_M", OriginFootprint 17="R 2512_M", OriginModelName="R 0603", SymbolName=R, UniqueId=d68336a531a39a0c, 封装库来自淘宝卖家 ID：黄晶宝石=其他店铺购入均为盗版，不享受售后技术支持服务，请立即申请退款, 版权归属="来自淘宝 ID：黄晶宝石", 联系售后=https://shop463601444.taobao.com
  R171: AddInBom=yes, DesignItemID=R, Device=R, FootprintName="R 0603_L", LibraryName="0.1 - 电阻-电容-电感", Origin Footprint="R 0201_L", OriginFootprint 2="R 0402_L", OriginFootprint 3="R 0805_L", OriginFootprint 4="R 1206_L", OriginFootprint 5="R 1210_L", OriginFootprint 6="R 1812_L", OriginFootprint 7="R 2010_L", OriginFootprint 8="R 2512_L", OriginFootprint 9="R 0201_M", OriginFootprint 10="R 0402_M", OriginFootprint 11="R 0603_M", OriginFootprint 12="R 0805_M", OriginFootprint 13="R 1206_M", OriginFootprint 14="R 1210_M", OriginFootprint 15="R 1812_M", OriginFootprint 16="R 2010_M", OriginFootprint 17="R 2512_M", OriginModelName="R 0603", SymbolName=R, UniqueId=6f4c4beafd605d3e, 封装库来自淘宝卖家 ID：黄晶宝石=其他店铺购入均为盗版，不享受售后技术支持服务，请立即申请退款, 版权归属="来自淘宝 ID：黄晶宝石", 联系售后=https://shop463601444.taobao.com
  R172: AddInBom=yes, DesignItemID=R, Device=R, FootprintName="R 0603_L", LibraryName="0.1 - 电阻-电容-电感", Origin Footprint="R 0201_L", OriginFootprint 2="R 0402_L", OriginFootprint 3="R 0805_L", OriginFootprint 4="R 1206_L", OriginFootprint 5="R 1210_L", OriginFootprint 6="R 1812_L", OriginFootprint 7="R 2010_L", OriginFootprint 8="R 2512_L", OriginFootprint 9="R 0201_M", OriginFootprint 10="R 0402_M", OriginFootprint 11="R 0603_M", OriginFootprint 12="R 0805_M", OriginFootprint 13="R 1206_M", OriginFootprint 14="R 1210_M", OriginFootprint 15="R 1812_M", OriginFootprint 16="R 2010_M", OriginFootprint 17="R 2512_M", OriginModelName="R 0603", SymbolName=R, UniqueId=21d05c86dd1c170d, 封装库来自淘宝卖家 ID：黄晶宝石=其他店铺购入均为盗版，不享受售后技术支持服务，请立即申请退款, 版权归属="来自淘宝 ID：黄晶宝石", 联系售后=https://shop463601444.taobao.com
  R173: AddInBom=yes, DesignItemID=R, Device=R, FootprintName="R 0603_L", LibraryName="0.1 - 电阻-电容-电感", Origin Footprint="R 0201_L", OriginFootprint 2="R 0402_L", OriginFootprint 3="R 0805_L", OriginFootprint 4="R 1206_L", OriginFootprint 5="R 1210_L", OriginFootprint 6="R 1812_L", OriginFootprint 7="R 2010_L", OriginFootprint 8="R 2512_L", OriginFootprint 9="R 0201_M", OriginFootprint 10="R 0402_M", OriginFootprint 11="R 0603_M", OriginFootprint 12="R 0805_M", OriginFootprint 13="R 1206_M", OriginFootprint 14="R 1210_M", OriginFootprint 15="R 1812_M", OriginFootprint 16="R 2010_M", OriginFootprint 17="R 2512_M", OriginModelName="R 0603", SymbolName=R, UniqueId=409031e5a22b12b4, 封装库来自淘宝卖家 ID：黄晶宝石=其他店铺购入均为盗版，不享受售后技术支持服务，请立即申请退款, 版权归属="来自淘宝 ID：黄晶宝石", 联系售后=https://shop463601444.taobao.com
  R174: AddInBom=yes, DesignItemID=R, Device=R, FootprintName="R 0603_L", LibraryName="0.1 - 电阻-电容-电感", Origin Footprint="R 0201_L", OriginFootprint 2="R 0402_L", OriginFootprint 3="R 0805_L", OriginFootprint 4="R 1206_L", OriginFootprint 5="R 1210_L", OriginFootprint 6="R 1812_L", OriginFootprint 7="R 2010_L", OriginFootprint 8="R 2512_L", OriginFootprint 9="R 0201_M", OriginFootprint 10="R 0402_M", OriginFootprint 11="R 0603_M", OriginFootprint 12="R 0805_M", OriginFootprint 13="R 1206_M", OriginFootprint 14="R 1210_M", OriginFootprint 15="R 1812_M", OriginFootprint 16="R 2010_M", OriginFootprint 17="R 2512_M", OriginModelName="R 0603", SymbolName=R, UniqueId=4347d18567640c38, 封装库来自淘宝卖家 ID：黄晶宝石=其他店铺购入均为盗版，不享受售后技术支持服务，请立即申请退款, 版权归属="来自淘宝 ID：黄晶宝石", 联系售后=https://shop463601444.taobao.com
  R175: AddInBom=yes, DesignItemID=R, Device=R, FootprintName="R 0603_L", LibraryName="0.1 - 电阻-电容-电感", Origin Footprint="R 0201_L", OriginFootprint 2="R 0402_L", OriginFootprint 3="R 0805_L", OriginFootprint 4="R 1206_L", OriginFootprint 5="R 1210_L", OriginFootprint 6="R 1812_L", OriginFootprint 7="R 2010_L", OriginFootprint 8="R 2512_L", OriginFootprint 9="R 0201_M", OriginFootprint 10="R 0402_M", OriginFootprint 11="R 0603_M", OriginFootprint 12="R 0805_M", OriginFootprint 13="R 1206_M", OriginFootprint 14="R 1210_M", OriginFootprint 15="R 1812_M", OriginFootprint 16="R 2010_M", OriginFootprint 17="R 2512_M", OriginModelName="R 0603", SymbolName=R, UniqueId=eb10a78dcd737970, 封装库来自淘宝卖家 ID：黄晶宝石=其他店铺购入均为盗版，不享受售后技术支持服务，请立即申请退款, 版权归属="来自淘宝 ID：黄晶宝石", 联系售后=https://shop463601444.taobao.com
  R176: AddInBom=yes, DesignItemID=R, Device=R, FootprintName="R 0603_L", LibraryName="0.1 - 电阻-电容-电感", Origin Footprint="R 0201_L", OriginFootprint 2="R 0402_L", OriginFootprint 3="R 0805_L", OriginFootprint 4="R 1206_L", OriginFootprint 5="R 1210_L", OriginFootprint 6="R 1812_L", OriginFootprint 7="R 2010_L", OriginFootprint 8="R 2512_L", OriginFootprint 9="R 0201_M", OriginFootprint 10="R 0402_M", OriginFootprint 11="R 0603_M", OriginFootprint 12="R 0805_M", OriginFootprint 13="R 1206_M", OriginFootprint 14="R 1210_M", OriginFootprint 15="R 1812_M", OriginFootprint 16="R 2010_M", OriginFootprint 17="R 2512_M", OriginModelName="R 0603", SymbolName=R, UniqueId=35c165bc28534d24, 封装库来自淘宝卖家 ID：黄晶宝石=其他店铺购入均为盗版，不享受售后技术支持服务，请立即申请退款, 版权归属="来自淘宝 ID：黄晶宝石", 联系售后=https://shop463601444.taobao.com
  R177: AddInBom=yes, DesignItemID=R, Device=R, FootprintName="R 0603_L", LibraryName="0.1 - 电阻-电容-电感", Origin Footprint="R 0201_L", OriginFootprint 2="R 0402_L", OriginFootprint 3="R 0805_L", OriginFootprint 4="R 1206_L", OriginFootprint 5="R 1210_L", OriginFootprint 6="R 1812_L", OriginFootprint 7="R 2010_L", OriginFootprint 8="R 2512_L", OriginFootprint 9="R 0201_M", OriginFootprint 10="R 0402_M", OriginFootprint 11="R 0603_M", OriginFootprint 12="R 0805_M", OriginFootprint 13="R 1206_M", OriginFootprint 14="R 1210_M", OriginFootprint 15="R 1812_M", OriginFootprint 16="R 2010_M", OriginFootprint 17="R 2512_M", OriginModelName="R 0603", SymbolName=R, UniqueId=81c939669f251c31, 封装库来自淘宝卖家 ID：黄晶宝石=其他店铺购入均为盗版，不享受售后技术支持服务，请立即申请退款, 版权归属="来自淘宝 ID：黄晶宝石", 联系售后=https://shop463601444.taobao.com
  R178: AddInBom=yes, DesignItemID=R, Device=R, FootprintName="R 0603_L", LibraryName="0.1 - 电阻-电容-电感", Origin Footprint="R 0201_L", OriginFootprint 2="R 0402_L", OriginFootprint 3="R 0805_L", OriginFootprint 4="R 1206_L", OriginFootprint 5="R 1210_L", OriginFootprint 6="R 1812_L", OriginFootprint 7="R 2010_L", OriginFootprint 8="R 2512_L", OriginFootprint 9="R 0201_M", OriginFootprint 10="R 0402_M", OriginFootprint 11="R 0603_M", OriginFootprint 12="R 0805_M", OriginFootprint 13="R 1206_M", OriginFootprint 14="R 1210_M", OriginFootprint 15="R 1812_M", OriginFootprint 16="R 2010_M", OriginFootprint 17="R 2512_M", OriginModelName="R 0603", SymbolName=R, UniqueId=e41387fe6cfc9cb2, 封装库来自淘宝卖家 ID：黄晶宝石=其他店铺购入均为盗版，不享受售后技术支持服务，请立即申请退款, 版权归属="来自淘宝 ID：黄晶宝石", 联系售后=https://shop463601444.taobao.com
  R179: AddInBom=yes, DesignItemID=R, Device=R, FootprintName="R 0603_L", LibraryName="0.1 - 电阻-电容-电感", Origin Footprint="R 0201_L", OriginFootprint 2="R 0402_L", OriginFootprint 3="R 0805_L", OriginFootprint 4="R 1206_L", OriginFootprint 5="R 1210_L", OriginFootprint 6="R 1812_L", OriginFootprint 7="R 2010_L", OriginFootprint 8="R 2512_L", OriginFootprint 9="R 0201_M", OriginFootprint 10="R 0402_M", OriginFootprint 11="R 0603_M", OriginFootprint 12="R 0805_M", OriginFootprint 13="R 1206_M", OriginFootprint 14="R 1210_M", OriginFootprint 15="R 1812_M", OriginFootprint 16="R 2010_M", OriginFootprint 17="R 2512_M", OriginModelName="R 0603", SymbolName=R, UniqueId=0a743140f9ea7b14, 封装库来自淘宝卖家 ID：黄晶宝石=其他店铺购入均为盗版，不享受售后技术支持服务，请立即申请退款, 版权归属="来自淘宝 ID：黄晶宝石", 联系售后=https://shop463601444.taobao.com
  R180: AddInBom=yes, DesignItemID=R, Device=R, FootprintName="R 0603_L", LibraryName="0.1 - 电阻-电容-电感", Origin Footprint="R 0201_L", OriginFootprint 2="R 0402_L", OriginFootprint 3="R 0805_L", OriginFootprint 4="R 1206_L", OriginFootprint 5="R 1210_L", OriginFootprint 6="R 1812_L", OriginFootprint 7="R 2010_L", OriginFootprint 8="R 2512_L", OriginFootprint 9="R 0201_M", OriginFootprint 10="R 0402_M", OriginFootprint 11="R 0603_M", OriginFootprint 12="R 0805_M", OriginFootprint 13="R 1206_M", OriginFootprint 14="R 1210_M", OriginFootprint 15="R 1812_M", OriginFootprint 16="R 2010_M", OriginFootprint 17="R 2512_M", OriginModelName="R 0603", SymbolName=R, UniqueId=c8e7fea75ae2c195, 封装库来自淘宝卖家 ID：黄晶宝石=其他店铺购入均为盗版，不享受售后技术支持服务，请立即申请退款, 版权归属="来自淘宝 ID：黄晶宝石", 联系售后=https://shop463601444.taobao.com
  R181: AddInBom=yes, DesignItemID=R, Device=R, FootprintName="R 0603_L", LibraryName="0.1 - 电阻-电容-电感", Origin Footprint="R 0201_L", OriginFootprint 2="R 0402_L", OriginFootprint 3="R 0805_L", OriginFootprint 4="R 1206_L", OriginFootprint 5="R 1210_L", OriginFootprint 6="R 1812_L", OriginFootprint 7="R 2010_L", OriginFootprint 8="R 2512_L", OriginFootprint 9="R 0201_M", OriginFootprint 10="R 0402_M", OriginFootprint 11="R 0603_M", OriginFootprint 12="R 0805_M", OriginFootprint 13="R 1206_M", OriginFootprint 14="R 1210_M", OriginFootprint 15="R 1812_M", OriginFootprint 16="R 2010_M", OriginFootprint 17="R 2512_M", OriginModelName="R 0603", SymbolName=R, UniqueId=b304d0fb6138316f, 封装库来自淘宝卖家 ID：黄晶宝石=其他店铺购入均为盗版，不享受售后技术支持服务，请立即申请退款, 版权归属="来自淘宝 ID：黄晶宝石", 联系售后=https://shop463601444.taobao.com
  R182: AddInBom=yes, DesignItemID=R, Device=R, FootprintName="R 0603_L", LibraryName="0.1 - 电阻-电容-电感", Origin Footprint="R 0201_L", OriginFootprint 2="R 0402_L", OriginFootprint 3="R 0805_L", OriginFootprint 4="R 1206_L", OriginFootprint 5="R 1210_L", OriginFootprint 6="R 1812_L", OriginFootprint 7="R 2010_L", OriginFootprint 8="R 2512_L", OriginFootprint 9="R 0201_M", OriginFootprint 10="R 0402_M", OriginFootprint 11="R 0603_M", OriginFootprint 12="R 0805_M", OriginFootprint 13="R 1206_M", OriginFootprint 14="R 1210_M", OriginFootprint 15="R 1812_M", OriginFootprint 16="R 2010_M", OriginFootprint 17="R 2512_M", OriginModelName="R 0603", SymbolName=R, UniqueId=e59f788bc85bcc1f, 封装库来自淘宝卖家 ID：黄晶宝石=其他店铺购入均为盗版，不享受售后技术支持服务，请立即申请退款, 版权归属="来自淘宝 ID：黄晶宝石", 联系售后=https://shop463601444.taobao.com
  R183: AddInBom=yes, DesignItemID=R, Device=R, FootprintName="R 0603_L", LibraryName="0.1 - 电阻-电容-电感", Origin Footprint="R 0201_L", OriginFootprint 2="R 0402_L", OriginFootprint 3="R 0805_L", OriginFootprint 4="R 1206_L", OriginFootprint 5="R 1210_L", OriginFootprint 6="R 1812_L", OriginFootprint 7="R 2010_L", OriginFootprint 8="R 2512_L", OriginFootprint 9="R 0201_M", OriginFootprint 10="R 0402_M", OriginFootprint 11="R 0603_M", OriginFootprint 12="R 0805_M", OriginFootprint 13="R 1206_M", OriginFootprint 14="R 1210_M", OriginFootprint 15="R 1812_M", OriginFootprint 16="R 2010_M", OriginFootprint 17="R 2512_M", OriginModelName="R 0603", SymbolName=R, UniqueId=e262797b4e338b99, 封装库来自淘宝卖家 ID：黄晶宝石=其他店铺购入均为盗版，不享受售后技术支持服务，请立即申请退款, 版权归属="来自淘宝 ID：黄晶宝石", 联系售后=https://shop463601444.taobao.com
  R184: AddInBom=yes, DesignItemID=R, Device=R, FootprintName="R 0603_L", LibraryName="0.1 - 电阻-电容-电感", Origin Footprint="R 0201_L", OriginFootprint 2="R 0402_L", OriginFootprint 3="R 0805_L", OriginFootprint 4="R 1206_L", OriginFootprint 5="R 1210_L", OriginFootprint 6="R 1812_L", OriginFootprint 7="R 2010_L", OriginFootprint 8="R 2512_L", OriginFootprint 9="R 0201_M", OriginFootprint 10="R 0402_M", OriginFootprint 11="R 0603_M", OriginFootprint 12="R 0805_M", OriginFootprint 13="R 1206_M", OriginFootprint 14="R 1210_M", OriginFootprint 15="R 1812_M", OriginFootprint 16="R 2010_M", OriginFootprint 17="R 2512_M", OriginModelName="R 0603", SymbolName=R, UniqueId=4edf9ccd7d55be5d, 封装库来自淘宝卖家 ID：黄晶宝石=其他店铺购入均为盗版，不享受售后技术支持服务，请立即申请退款, 版权归属="来自淘宝 ID：黄晶宝石", 联系售后=https://shop463601444.taobao.com
  R185: AddInBom=yes, DesignItemID=R, Device=R, FootprintName="R 0603_L", LibraryName="0.1 - 电阻-电容-电感", Origin Footprint="R 0201_L", OriginFootprint 2="R 0402_L", OriginFootprint 3="R 0805_L", OriginFootprint 4="R 1206_L", OriginFootprint 5="R 1210_L", OriginFootprint 6="R 1812_L", OriginFootprint 7="R 2010_L", OriginFootprint 8="R 2512_L", OriginFootprint 9="R 0201_M", OriginFootprint 10="R 0402_M", OriginFootprint 11="R 0603_M", OriginFootprint 12="R 0805_M", OriginFootprint 13="R 1206_M", OriginFootprint 14="R 1210_M", OriginFootprint 15="R 1812_M", OriginFootprint 16="R 2010_M", OriginFootprint 17="R 2512_M", OriginModelName="R 0603", SymbolName=R, UniqueId=9e0eccf13a6f31a8, 封装库来自淘宝卖家 ID：黄晶宝石=其他店铺购入均为盗版，不享受售后技术支持服务，请立即申请退款, 版权归属="来自淘宝 ID：黄晶宝石", 联系售后=https://shop463601444.taobao.com
  R186: AddInBom=yes, DesignItemID=R, Device=R, FootprintName="R 0603_L", LibraryName="0.1 - 电阻-电容-电感", Origin Footprint="R 0201_L", OriginFootprint 2="R 0402_L", OriginFootprint 3="R 0805_L", OriginFootprint 4="R 1206_L", OriginFootprint 5="R 1210_L", OriginFootprint 6="R 1812_L", OriginFootprint 7="R 2010_L", OriginFootprint 8="R 2512_L", OriginFootprint 9="R 0201_M", OriginFootprint 10="R 0402_M", OriginFootprint 11="R 0603_M", OriginFootprint 12="R 0805_M", OriginFootprint 13="R 1206_M", OriginFootprint 14="R 1210_M", OriginFootprint 15="R 1812_M", OriginFootprint 16="R 2010_M", OriginFootprint 17="R 2512_M", OriginModelName="R 0603", SymbolName=R, UniqueId=a6178234e12ca1a3, 封装库来自淘宝卖家 ID：黄晶宝石=其他店铺购入均为盗版，不享受售后技术支持服务，请立即申请退款, 版权归属="来自淘宝 ID：黄晶宝石", 联系售后=https://shop463601444.taobao.com
  R187: AddInBom=yes, DesignItemID=R, Device=R, FootprintName="R 0603_L", LibraryName="0.1 - 电阻-电容-电感", Origin Footprint="R 0201_L", OriginFootprint 2="R 0402_L", OriginFootprint 3="R 0805_L", OriginFootprint 4="R 1206_L", OriginFootprint 5="R 1210_L", OriginFootprint 6="R 1812_L", OriginFootprint 7="R 2010_L", OriginFootprint 8="R 2512_L", OriginFootprint 9="R 0201_M", OriginFootprint 10="R 0402_M", OriginFootprint 11="R 0603_M", OriginFootprint 12="R 0805_M", OriginFootprint 13="R 1206_M", OriginFootprint 14="R 1210_M", OriginFootprint 15="R 1812_M", OriginFootprint 16="R 2010_M", OriginFootprint 17="R 2512_M", OriginModelName="R 0603", SymbolName=R, UniqueId=01fdb669dc90136a, 封装库来自淘宝卖家 ID：黄晶宝石=其他店铺购入均为盗版，不享受售后技术支持服务，请立即申请退款, 版权归属="来自淘宝 ID：黄晶宝石", 联系售后=https://shop463601444.taobao.com
  R188: AddInBom=yes, DesignItemID=R, Device=R, FootprintName="R 0603_L", LibraryName="0.1 - 电阻-电容-电感", Origin Footprint="R 0201_L", OriginFootprint 2="R 0402_L", OriginFootprint 3="R 0805_L", OriginFootprint 4="R 1206_L", OriginFootprint 5="R 1210_L", OriginFootprint 6="R 1812_L", OriginFootprint 7="R 2010_L", OriginFootprint 8="R 2512_L", OriginFootprint 9="R 0201_M", OriginFootprint 10="R 0402_M", OriginFootprint 11="R 0603_M", OriginFootprint 12="R 0805_M", OriginFootprint 13="R 1206_M", OriginFootprint 14="R 1210_M", OriginFootprint 15="R 1812_M", OriginFootprint 16="R 2010_M", OriginFootprint 17="R 2512_M", OriginModelName="R 0603", SymbolName=R, UniqueId=e4d4da7e660617df, 封装库来自淘宝卖家 ID：黄晶宝石=其他店铺购入均为盗版，不享受售后技术支持服务，请立即申请退款, 版权归属="来自淘宝 ID：黄晶宝石", 联系售后=https://shop463601444.taobao.com
  R189: AddInBom=yes, DesignItemID=R, Device=R, FootprintName="R 0603_L", LibraryName="0.1 - 电阻-电容-电感", Origin Footprint="R 0201_L", OriginFootprint 2="R 0402_L", OriginFootprint 3="R 0805_L", OriginFootprint 4="R 1206_L", OriginFootprint 5="R 1210_L", OriginFootprint 6="R 1812_L", OriginFootprint 7="R 2010_L", OriginFootprint 8="R 2512_L", OriginFootprint 9="R 0201_M", OriginFootprint 10="R 0402_M", OriginFootprint 11="R 0603_M", OriginFootprint 12="R 0805_M", OriginFootprint 13="R 1206_M", OriginFootprint 14="R 1210_M", OriginFootprint 15="R 1812_M", OriginFootprint 16="R 2010_M", OriginFootprint 17="R 2512_M", OriginModelName="R 0603", SymbolName=R, UniqueId=09b823a69019dbbf, 封装库来自淘宝卖家 ID：黄晶宝石=其他店铺购入均为盗版，不享受售后技术支持服务，请立即申请退款, 版权归属="来自淘宝 ID：黄晶宝石", 联系售后=https://shop463601444.taobao.com